# Altium PCB PCB-MIC.PcbDoc
Units mm, origin at the board's own origin, x right, y up, seen from the top; angles counter-clockwise.
Board outline 24 x 22 mm, 2 copper layers (F.Cu, B.Cu); 6 components, 7 nets, 53 pads, 5 vias.
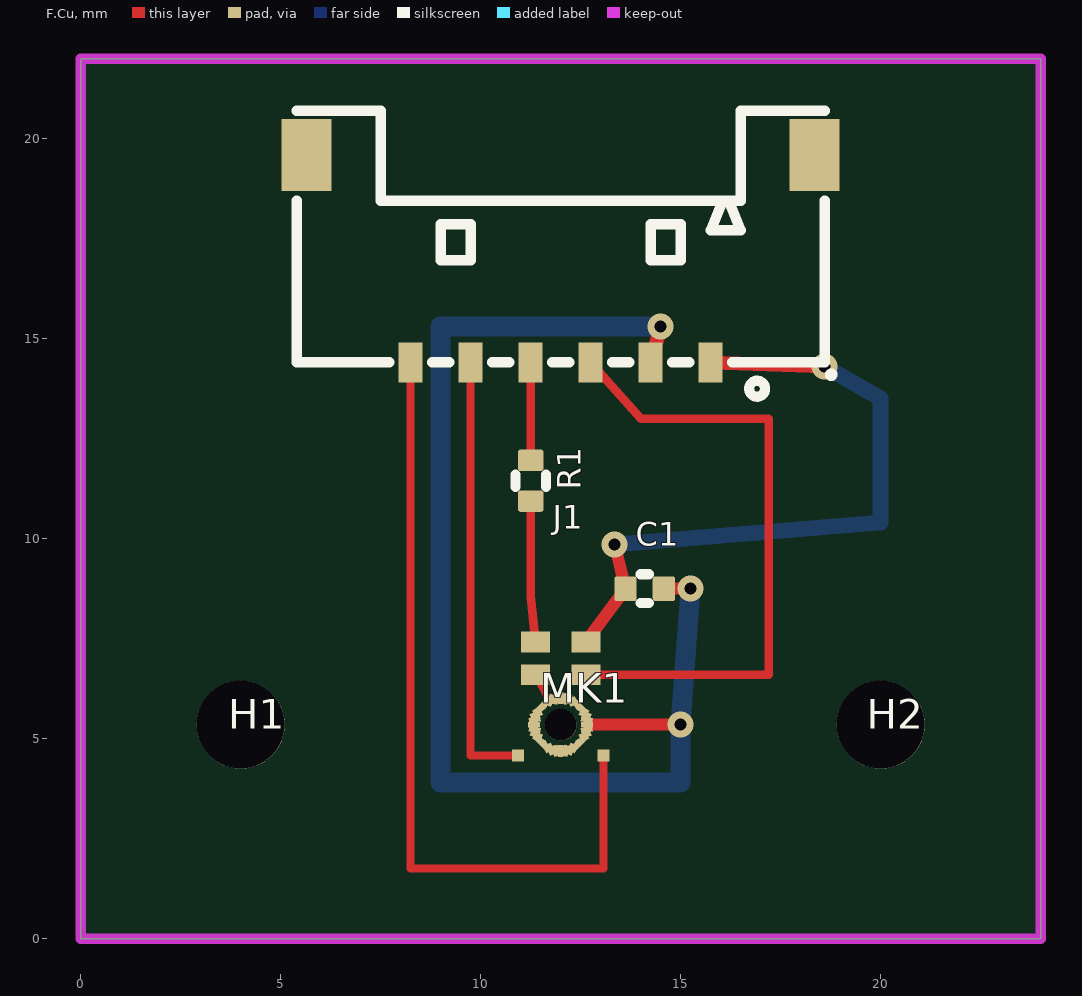
[diagram p0: F.Cu view]
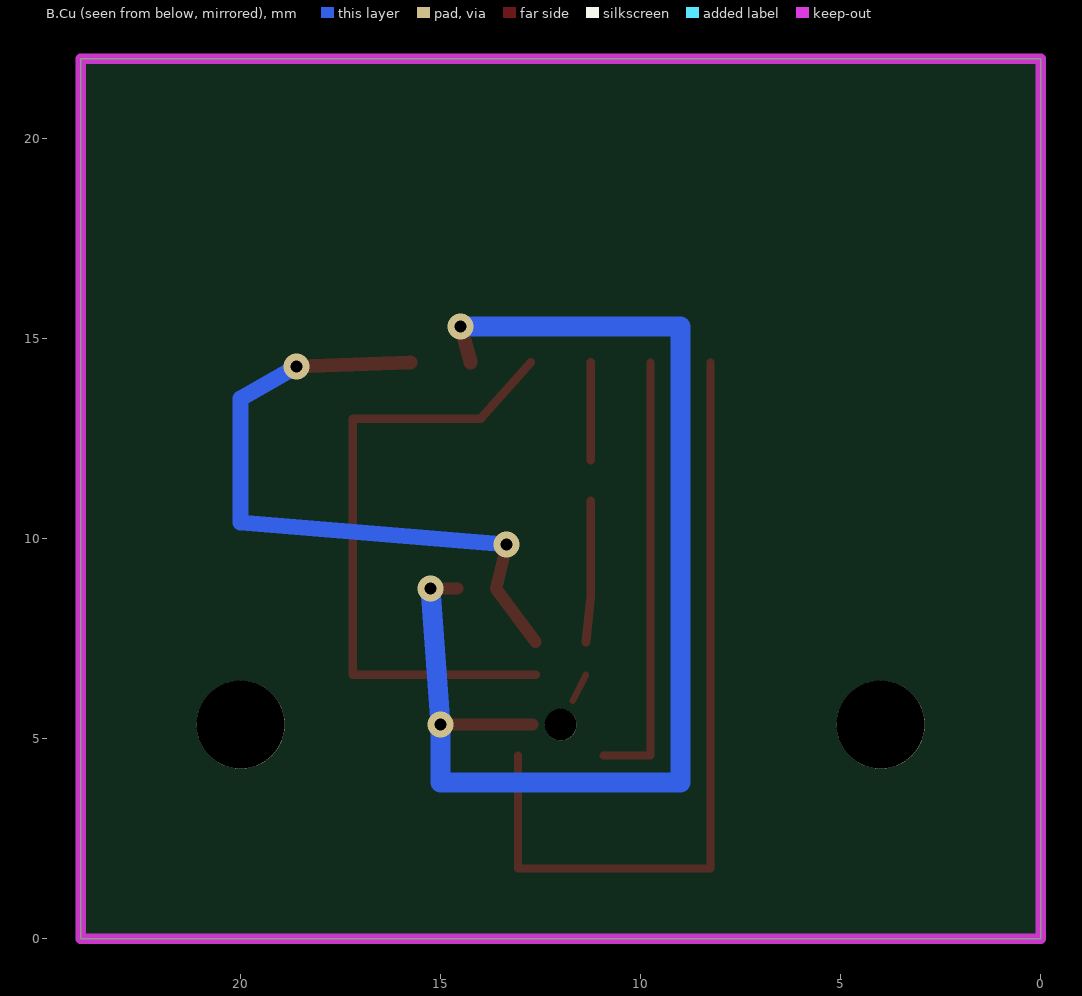
[diagram p1: B.Cu view, seen from below]

## Layer stack, top to bottom
F.Mask: solder mask 0.0102, Solder Resist, Dk 3.5
F.Cu: signal copper 0.0356
Dielectric 1: dielectric 0.32, FR-4, Dk 4.8
B.Cu: signal copper 0.0356
B.Mask: solder mask 0.0102, Solder Resist, Dk 3.5

## Board outline
0,0 0,22 24,22 24,0 0,0

## Design rules (kind name [scope] priority, off if disabled: settings)
Clearance "Clearence 0,2_NetClass" [InNetClass('Default')] p1: gap=0.2 ignorepadtopadclearanceinfootprint=FALSE
MinimumSolderMaskSliver [All] p1: minsoldermaskwidth=0
PolygonConnect [All] p1: connectstyle=Direct reliefconductorwidth=0.254 reliefentries=4 polygonreliefangle="90 Angle" airgapwidth=0.254
RoutingVias [All] p1: holewidth=0.711 width=1.27 viastyle="Through Hole" minholewidth=0.711 minwidth=1.27 maxholewidth=0.711 maxwidth=1.27
SilkToSilkClearance [All] p1: silktosilkclearance=0
SilkToSolderMaskClearance [IsPad] p1: minsilkscreentomaskgap=0 clearancetoexposedcopper=TRUE
SolderMaskExpansion [All] p1: expansion=0 istentingtop=FALSE
Width [All] p1: maxlimit=10 minlimit=0.254 preferedwidth=0.2 minimp=50.000000 maximp=50.000000 favimp=50.000000
27 further rules are at their usual default settings.

## Classes and differential pairs
net class Default: 1V8_MIC AAD_CFG GND MIC_WAKE PDM_CLK PDM_DATA PDM_DATA_MIC

## Components (designator, comment, footprint, x,y, rotation, side; value= is the part's Value field where it differs from the comment)
C1 "Comment" C_0402_1005Metric 14.1,8.75 r0 top value="100nF X7R"
H1 "Comment" ? 4,5.35 r0 top value=M2_CLEARANCE_NPTH_2.2
H2 "Comment" ? 20,5.35 r0 top value=M2_CLEARANCE_NPTH_2.2
J1 "Comment" Molex_5040500691 12,17 r180 top value=5040500691
MK1 "Comment" T5838_RevA 12,6 r0 top value=T5838
R1 "Comment" R_0402_1005Metric 11.25,11.45 r270 top value="0R EVT_SI_TUNE"

## Footprints (in the part's own frame and the unit in brackets; to place one, negate y for a bottom-side part, rotate by r counter-clockwise, add the part's x,y. Pads: shape width x height; smd on the part's side, far side on the other; paste and mask are expansions set on the pad)
C_0402_1005Metric [mm]
  rrect25% 0.56x0.62 smd mask+0: 1(-0.48,0) 2(0.48,0)
  silkscreen extent -0.11,-0.36 0.11,0.36
Molex_5040500691 [mm]
  rect 0.6x1 smd paste+0 mask+0: 1(-3.75,2.59) 2(-2.25,2.59) 3(-0.75,2.59) 4(0.75,2.59) 5(2.25,2.59) 6(3.75,2.59)
  rect 1.25x1.8 smd mask+0: Un1(-6.35,-2.59) Un2(6.35,-2.59)
  silkscreen extent -6.79,-3.7 6.6,3.45
R_0402_1005Metric [mm]
  rrect25% 0.54x0.64 smd mask+0: 1(-0.51,0) 2(0.51,0)
  silkscreen extent -0.15,-0.38 0.15,0.38
T5838_RevA [mm]
  rect 0.725x0.522 smd paste-0.05 mask+0: 1(-0.63,1.42) 2(-0.63,0.6) 6(0.63,0.6) 7(0.63,1.42)
  rect 0.3x0.146 smd paste-0.3 mask+0: 3(-0.663,-0.65) 3(0.663,-0.65)
  rect 0.146x0.3 smd rot 78.75 paste-0.3 mask+0: 3(-0.65,-0.779) 3(0.65,-0.521)
  rect 0.146x0.3 smd rot 101.25 paste-0.3 mask+0: 3(-0.65,-0.521) 3(0.65,-0.779)
  rect 0.146x0.3 smd rot 67.5 paste-0.3 mask+0: 3(-0.612,-0.904) 3(0.612,-0.396)
  rect 0.146x0.3 smd rot 112.5 paste-0.3 mask+0: 3(-0.612,-0.396) 3(0.612,-0.904)
  rect 0.146x0.3 smd rot 56.25 paste-0.3 mask+0: 3(-0.551,-1.018) 3(0.551,-0.282)
  rect 0.146x0.3 smd rot 123.75 paste-0.3 mask+0: 3(-0.551,-0.282) 3(0.551,-1.018)
  rect 0.146x0.3 smd rot 45 paste-0.3 mask+0: 3(-0.468,-1.118) 3(0.468,-0.182)
  rect 0.146x0.3 smd rot 135 paste-0.3 mask+0: 3(-0.468,-0.182) 3(0.468,-1.118)
  rect 0.146x0.3 smd rot 33.75 paste-0.3 mask+0: 3(-0.368,-1.201) 3(0.368,-0.099)
  rect 0.146x0.3 smd rot 146.25 paste-0.3 mask+0: 3(-0.368,-0.099) 3(0.368,-1.201)
  rect 0.146x0.3 smd rot 22.5 paste-0.3 mask+0: 3(-0.254,-1.262) 3(0.254,-0.038)
  rect 0.146x0.3 smd rot 157.5 paste-0.3 mask+0: 3(-0.254,-0.038) 3(0.254,-1.262)
  rect 0.146x0.3 smd rot 11.25 paste-0.3 mask+0: 3(-0.129,-1.3) 3(0.129,0)
  rect 0.146x0.3 smd rot 168.75 paste-0.3 mask+0: 3(-0.129,0) 3(0.129,-1.3)
  rect 0.146x0.3 smd paste-0.3 mask+0: 3(0,-1.312) 3(0,0.013)
  rect 0.3x0.3 smd paste-0.015 mask+0: 4(-1.07,-1.42) 5(1.07,-1.42)
  round 0.8 hole 0.8 paste-2539.97 mask+0: Un1(0,-0.65)
? [mm]
  round 2.2 hole 2.2 paste-2539.97 mask+0: Un1(0,0)

## Part data
C1: library part C_0402_1005Metric, "Capacitor SMD 0402 (1005 Metric), square (rectangular) end terminal, IPC-7351 nominal, (Body size source: IPC-SM-782 page 76, https://www.pcb-3d.com/wordpress/wp-content/uploads/ipc-sm-782a_amendment_1_and_2.pdf), generated with kicad-footprint-generator"
J1: library part Molex_5040500691, LCSC Part=C563981
MK1: library part T5838_RevA
R1: library part R_0402_1005Metric, "Resistor SMD 0402 (1005 Metric), square (rectangular) end terminal, IPC-7351 nominal, (Body size source: IPC-SM-782 page 72, https://www.pcb-3d.com/wordpress/wp-content/uploads/ipc-sm-782a_amendment_1_and_2.pdf), generated with kicad-footprint-generator"

## Via types
v1: diameter 0.65, hole 0.3, F.Cu to B.Cu, tented both sides, 5 vias

## Nets (pads, with @x,y where several pads share a name; then routed paths per layer and width w, separated by ;. In a path a pad name is that pad's centre, name@x,y a point inside that pad or via, vN(x,y) a via of type N, cw(c..) or ccw(c..) an arc to the next point about the centre after c; other vN are vias at no path point)
1V8_MIC: C1.1 J1.1 MK1.7 | length 17
  F.Cu w0.3: MK1.7 C1.1 v1(13.35,9.85)
  F.Cu w0.35: J1.1 v1(18.6,14.3)
  B.Cu w0.4: v1(13.35,9.85) 20,10.4 20,13.5 v1(18.6,14.3)
AAD_CFG: J1.6 MK1.5 | length 20.3
  F.Cu w0.2: J1.6 8.25,1.75 13.07,1.75 MK1.5
GND: C1.2 J1.2 MK1.2 MK1.3 | length 32.4
  F.Cu w0.16: MK1.2 MK1.3@11.7,5.95
  F.Cu w0.3: MK1.3@12.7,5.35 v1(15,5.35) ; C1.2 v1(15.25,8.75)
  F.Cu w0.35: J1.2 v1(14.5,15.3)
  B.Cu w0.5: v1(14.5,15.3) 9,15.3 9,3.9 15,3.9 v1(15,5.35) v1(15.25,8.75)
MIC_WAKE: J1.5 MK1.4 | length 11
  F.Cu w0.2: J1.5 9.75,4.58 MK1.4
PDM_CLK: J1.3 MK1.6 | length 16.1
  F.Cu w0.22: MK1.6 17.2,6.6 17.2,13 14,13 J1.3
PDM_DATA: J1.4 R1.1 | length 2.5
  F.Cu w0.22: R1.1 J1.4
PDM_DATA_MIC: MK1.1 R1.2 | length 3.5
  F.Cu w0.22: R1.2 11.25,8.55 MK1.1
pads on no net: H1.Un1 H2.Un1 J1.Un1 J1.Un2 MK1.Un1

## Keep-outs
Edge.Cuts:
  lines w0: 0,0 24,0 24,22 0,22 0,0
  lines w0.254: 0,0 24,0 24,22 0,22 0,0

## Silkscreen, mask and mechanical layers (free items; w line width, h text height)
F.Paste:
  circle w0.254: c12,5.35 r0.687
F.Fab:
  lines w0.254: 10.675,4.25 13.325,4.25 13.325,7.75 10.675,7.75 10.675,4.25
  text "PCB-MIC Rev.A MECHANICAL FREEZE - NOT FOR MANUFACTURE" at 6.691,0.6 h0.7